# Altium PCB POD-Design-v1.1.PcbDoc (part 5 of 7)
Units mil, origin at the board's own origin, x right, y up, seen from the top; angles counter-clockwise.
Board outline 5511.81 x 3937.01 mil, 4 copper layers (Top Layer, Layer 1, Layer 2, Bottom Layer), stack 61.653 mil thick; 308 components, 227 nets, 905 pads, 367 vias.
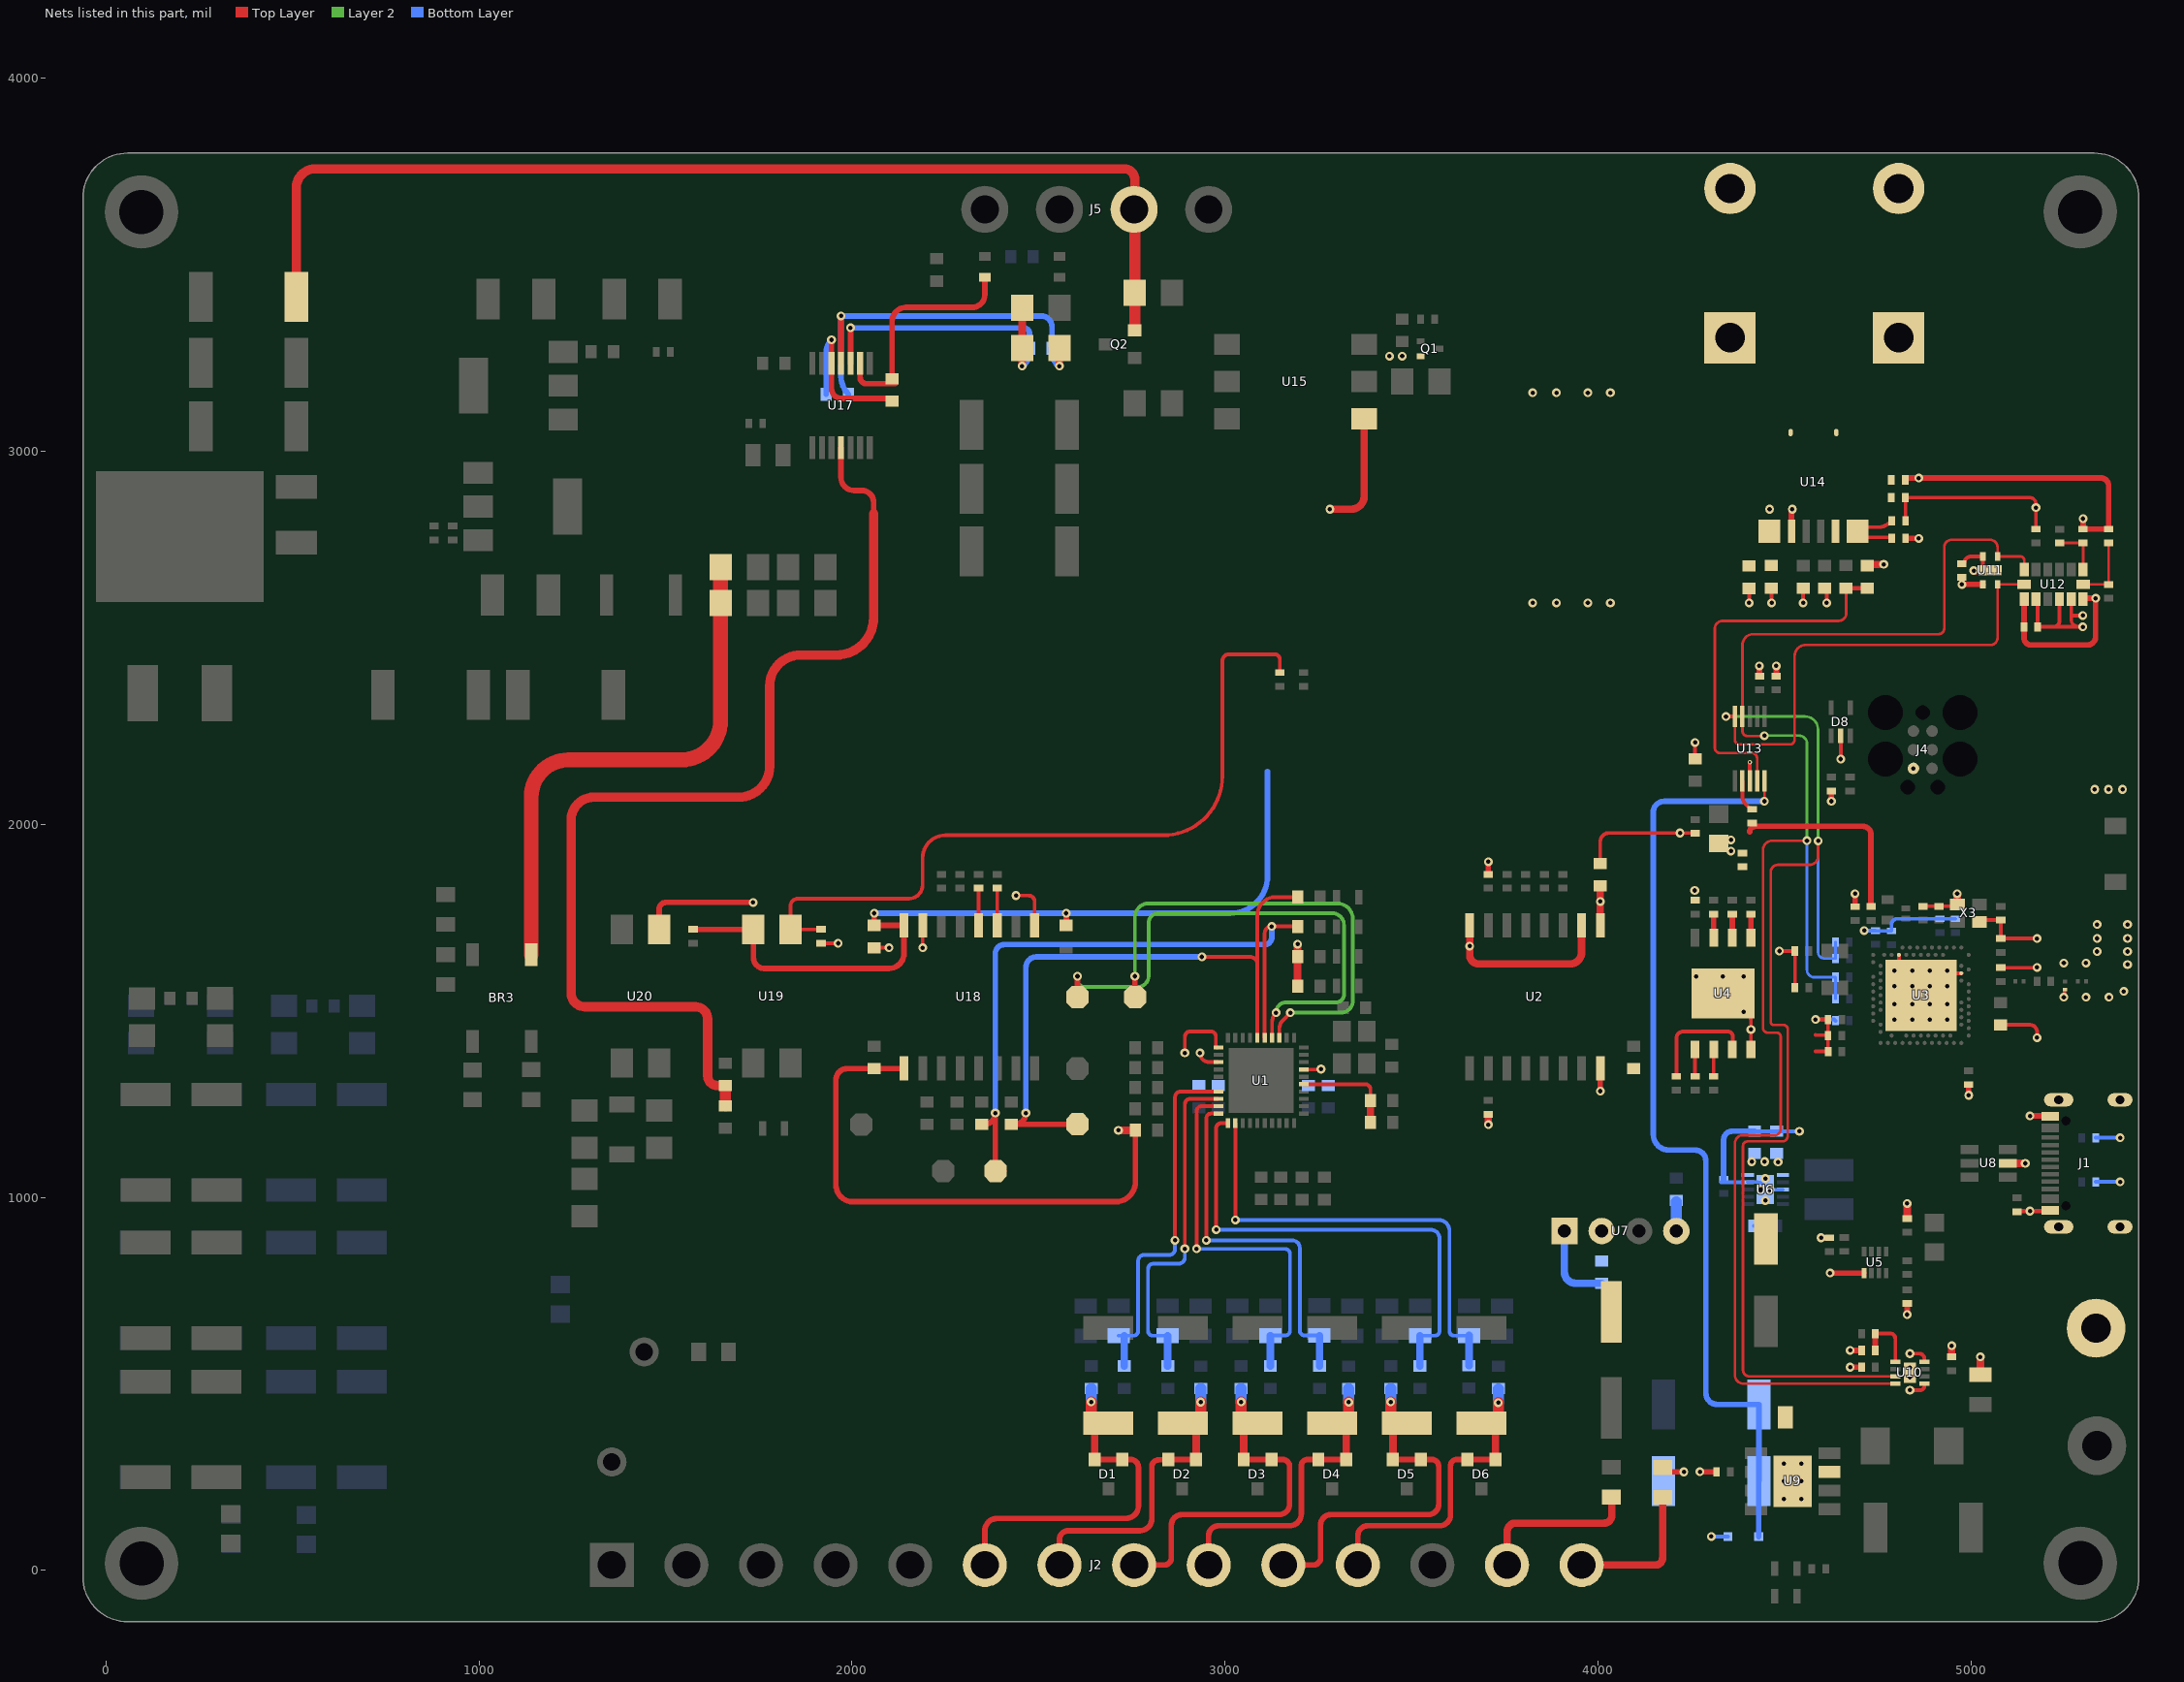
[diagram p4: the nets of this part, all layers, seen from the top]

## Part data (continued)
U17: "IC SIGNAL PROCESSOR 14TSSOP", LCSC Part Number=C904570, Manufacturer=onsemi, Manufacturer Lifecycle Status=ACTIVE, Max Operating Temperature=70°C, Max Supply Current=10mA, Max Supply Voltage=13V, Min Operating Temperature=0°C, Operating Supply Voltage=12V, China RoHS=Compliant, ComponentLink1Description=https://datasheet.octopart.com:443/NCS37020DTBR2G-onsemi-datasheet-180965843.pdf?src-supplier=IHS, ComponentLink1URL=https://datasheet.octopart.com:443/NCS37020DTBR2G-onsemi-datasheet-180965843.pdf?src-supplier=IHS, ComponentLink2Description=https://datasheet.octopart.com:443/NCS37020DTBR2G-ON-Semiconductor-datasheet-139012421.pdf?src-supplier=Master+Electronics, ComponentLink2URL=https://datasheet.octopart.com:443/NCS37020DTBR2G-ON-Semiconductor-datasheet-139012421.pdf?src-supplier=Master+Electronics, ComponentLink3Description=https://datasheet.octopart.com:443/NCS37020DTBR2G-ON-Semiconductor-datasheet-137129895.pdf?src-supplier=onsemi, ComponentLink3URL=https://datasheet.octopart.com:443/NCS37020DTBR2G-ON-Semiconductor-datasheet-137129895.pdf?src-supplier=onsemi, ComponentLink4Description=http://sigma.octopart.com:80/reach_statement/ON-Semiconductor-company-79.pdf?src-supplier=Compliance+Statements, ComponentLink4URL=http://sigma.octopart.com:80/reach_statement/ON-Semiconductor-company-79.pdf?src-supplier=Compliance+Statements, ComponentLink5Description=https://octopart.com:443/opatz8j6/c1?t=ZQW9HMtH4k71rWyV6AJY4tuW3XheiTOPmjmobTXB_F26sMcwWMhmH10pq7sQJYBRXfGSHYWRpmqpvFarTcJ6IR5mJHNE_a9wC_wytZDRLioJeZ7QsJAeRfWIGI1BjBRFqUYimvJtzLjCjz17RDpSBx7XSL-tIesgpAoA9dkWd1QvjggH5Lf3PglFk8Jmj008jqbUnKitEB1RpbYA_80My9UupV7zL5uwbriqM9u8ka-eDVP0HHlgEyvlk90TkPkxt1apKx9jOG4F6f6WcXkBfOtrxuHJ_x8hryS4-VTjD0u0BN_yaFUAv4LE__5U5qDUiotF1QbODTNZ71WeSvwhQDdPzE4qpMHglnhuqzT235XeMYg&src-supplier=Compliance+Statements, ComponentLink5URL=https://octopart.com:443/opatz8j6/c1?t=ZQW9HMtH4k71rWyV6AJY4tuW3XheiTOPmjmobTXB_F26sMcwWMhmH10pq7sQJYBRXfGSHYWRpmqpvFarTcJ6IR5mJHNE_a9wC_wytZDRLioJeZ7QsJAeRfWIGI1BjBRFqUYimvJtzLjCjz17RDpSBx7XSL-tIesgpAoA9dkWd1QvjggH5Lf3PglFk8Jmj008jqbUnKitEB1RpbYA_80My9UupV7zL5uwbriqM9u8ka-eDVP0HHlgEyvlk90TkPkxt1apKx9jOG4F6f6WcXkBfOtrxuHJ_x8hryS4-VTjD0u0BN_yaFUAv4LE__5U5qDUiotF1QbODTNZ71WeSvwhQDdPzE4qpMHglnhuqzT235XeMYg&src-supplier=Compliance+Statements, ComponentLink6Description=https://octopart.com:443/opatz8j6/c1?t=HismN954h6fGmh9fmuQcgXhTaW1LIpJi1zfdE4ekLkTpZNiJX5OuPT8uhS35awRxYVrPSlueGbHyRXMTAgi5oFyNekVsRZ8Wf8rZ0DBuUfKFuVTFVFD9ObD5jmIONxQZYnS7ApbkheX8jjM_HLR7wXao3cq_nbkOSh1zihM_Cb25b-mOFKzO57l-cPraBIcXhIIoS2L5CzwghySSn828_I70UIOuSkvLkmcdjxM7wbVRBzaqQtktMNEHz6OXR8jKrzYQQpbeYqdyN6vjnc-d046VHgn1wFMO-_Mp3x6HmAFm7wxh74XFnntKtcXzz-IGW-eRo0i-X4dDM8t3zvT-QSalQbhBf0_OjmbV5ssDUWXnLg&src-supplier=Compliance+Statements, ComponentLink6URL=https://octopart.com:443/opatz8j6/c1?t=HismN954h6fGmh9fmuQcgXhTaW1LIpJi1zfdE4ekLkTpZNiJX5OuPT8uhS35awRxYVrPSlueGbHyRXMTAgi5oFyNekVsRZ8Wf8rZ0DBuUfKFuVTFVFD9ObD5jmIONxQZYnS7ApbkheX8jjM_HLR7wXao3cq_nbkOSh1zihM_Cb25b-mOFKzO57l-cPraBIcXhIIoS2L5CzwghySSn828_I70UIOuSkvLkmcdjxM7wbVRBzaqQtktMNEHz6OXR8jKrzYQQpbeYqdyN6vjnc-d046VHgn1wFMO-_Mp3x6HmAFm7wxh74XFnntKtcXzz-IGW-eRo0i-X4dDM8t3zvT-QSalQbhBf0_OjmbV5ssDUWXnLg&src-supplier=Compliance+Statements, Height - Seated (Max)=1.2mm, Item Type="Sensor and Detector Interfaces", Length=5mm, Lifecycle Status=Production, Manufacturer Part Number=NCS37020DTBR2G, Number of Terminals=14, Pricing="1=0.99, 10=0.713, 25=0.6436, 100=0.5668, 250=0.53028, 500=0.50824, 1000=0.4901 (USD)", REACH SVHC=Yes, RoHS=Compliant, Stock=2623, Supplier=DigiKey, Terminal Pitch=650µm, Width=4.4mm
U18: "DGTL ISO 5000VRMS 4CH GP 16SOIC", LCSC Part Number=C529547, Manufacturer="Texas Instruments", ComponentLink1Description=http://www.ti.com/general/docs/lit/getliterature.tsp?genericPartNumber=ISO7740&fileType=pdf&src-supplier=Farnell, ComponentLink1URL=http://www.ti.com/general/docs/lit/getliterature.tsp?genericPartNumber=ISO7740&fileType=pdf&src-supplier=Farnell, ComponentLink2Description=http://www.ti.com/lit/ds/symlink/iso7741.pdf?src-supplier=Digikey, ComponentLink2URL=http://www.ti.com/lit/ds/symlink/iso7741.pdf?src-supplier=Digikey, ComponentLink3Description=http://www.farnell.com/datasheets/2113498.pdf?src-supplier=Element14, ComponentLink3URL=http://www.farnell.com/datasheets/2113498.pdf?src-supplier=Element14, ComponentLink4Description=http://www.ti.com/general/docs/suppproductinfo.tsp?distId=10&amp;gotoUrl=http%3A%2F%2Fwww.ti.com%2Flit%2Fgpn%2Fiso7741&src-supplier=Digikey, ComponentLink4URL=http://www.ti.com/general/docs/suppproductinfo.tsp?distId=10&amp;gotoUrl=http%3A%2F%2Fwww.ti.com%2Flit%2Fgpn%2Fiso7741&src-supplier=Digikey, Height=2.65mm, Item Type=IC, Lead Free=5697LeadFree, Length=10.3mm, Manufacturer Part Number=ISO7740DWR, Pricing="1=2.71, 10=1.85, 50=1.85, 100=1.61, 1000=1.59, 10000=1.59 (USD)", RoHS=Yes, Stock=19329, Supplier=Mouser, Thickness=2.35mm, Width=7.5mm
U19 U20: "OPTOISOLATOR 5.3KV TRANS 4SMD", LCSC Part Number=C5156027, Manufacturer=Vishay, Item Type=IC, Manufacturer Part Number=SFH6156-2, Pricing="1=0.56, 10=0.37, 50=0.37, 100=0.253, 1000=0.218, 10000=0.217 (USD)", RoHS=No, Stock=11480, Supplier=Mouser
X1: library part X322524576MOB4SI, "24.576MHz Surface Mount Crystal 12pF ±10ppm ±20ppm SMD3225-4P Crystals ROHS", LCSC Part Number=C70568, Manufacturer=YXC, ComponentLink1Description=LCSC, ComponentLink1URL=https://www.lcsc.com/product-detail/Crystals_YXC-Crystal-Oscillators-X322524576MOB4SI_C70568.html?s_z=n_X322524576MOB4SI, Item Type=Crystal, Manufacturer Part Number=X322524576MOB4SI, RoHS=No, Supplier=LCSC
X2: library part Q13FC13500049, "Crystal, 32.768KHZ, 6PF, 3.2MM X 1.5MM Rohs Compliant: Yes", LCSC Part Number=C95361, Manufacturer=Epson, Item Type=Crystal, Manufacturer Part Number=Q13FC13500049, Pricing="100=5.52, 250=5.41 (DKK)", RoHS=No, Stock=760, Supplier=Farnell
X3: library part Q22FA12800025, "CRYSTAL 32.0000MHZ 8PF SMD", LCSC Part Number=C187794, Manufacturer=Epson, ComponentLink1Description=http://ndap3-net.ebz.epson.co.jp/w/www/PDFS/epdoc_qd.nsf/85a4e2c523a1f89349257068002f9e30/255cb2884010a1f9492571f0004c7d72/$FILE/FA-128_E09X.pdf?src-supplier=Newark, ComponentLink1URL=http://ndap3-net.ebz.epson.co.jp/w/www/PDFS/epdoc_qd.nsf/85a4e2c523a1f89349257068002f9e30/255cb2884010a1f9492571f0004c7d72/$FILE/FA-128_E09X.pdf?src-supplier=Newark, ComponentLink2Description=http://www.farnell.com/datasheets/1734615.pdf?src-supplier=Newark, ComponentLink2URL=http://www.farnell.com/datasheets/1734615.pdf?src-supplier=Newark, Item Type=Crystal, Manufacturer Part Number=Q22FA12800025, Pricing="250=0.511 (GBP)", RoHS=Yes, Stock=250, Supplier=Farnell

## Free pads (board coordinates)
  round 196.85 hole 118.11: MH(95.31,3641.74) MH(95.67,19.32) MH(5292.52,3642.09) MH(5292.88,19.68)

## Via types
v1: diameter 23.62, hole 11.81, Top Layer to Bottom Layer, tented both sides, 332 vias
v2: diameter 11.81, hole 5.91, Top Layer to Bottom Layer, tented both sides, 34 vias
v3: diameter 15.75, hole 5.91, Top Layer to Bottom Layer, tented both sides, 1 vias

## Nets (pads, with @x,y where several pads share a name; then routed paths per layer and width w, separated by ;. In a path a pad name is that pad's centre, name@x,y a point inside that pad or via, vN(x,y) a via of type N, cw(c..) or ccw(c..) an arc to the next point about the centre after c; other vN are vias at no path point)
3V3: C15.2 C57.2 C58.2 C61.2 C67.2 C68.1 C71.2 C73.2 C74.2 C110.2 FB6.2 R21.1 R54.1 R67.2 R76.1 R78.2 R79.2 R82.2 R89.1 R90.1 R157.1 R161.1 U2.1 U6.1 U6.10 U7.2 U11.1 U12.1 U12.6 U14.1 U15.1 U18.16 U19.4 | length 4682.3
  Top Layer w15: R157.1@1574,1718.54 U19.4@1735,1718.54 cw(c1735,1717.54) 1736,1717.54 1736,1642.53 ; 1736,1641 1736,1642.53 ; v1(2059.49,1761.85) C110.2@2059.49,1729.37 U18.16@2139.49,1729.37 2139.49,1654.37 cw(c2099.11,1654.37) 2099.11,1614 1764.53,1614 cw(c1764.53,1642.53) 1736,1642.53 ; R161.1@2574.49,1729.37 v1(2574.49,1761.85) ; R21.1@3705.93,1865.94 v1(3705.93,1900) ; 4406.71,1980 cw(c4421.64,1980) 4421.64,1994.93 4709.9,1994.93 cw(c4709.9,1973.17) 4731.66,1973.17 R54.1@4731.66,1779.82 ; v1(4597.95,891.9) R67.2@4620.63,891.91 ; v1(4676,590) R76.1@4706.38,590 ; R90.1@4823.42,2928.65 v1(4859.92,2928.65) ; R89.1@4824.42,2766.69 v1(4859.96,2766.69) ; v1@4860.6,2928.65 5347.79,2928.65 cw(c5347.79,2907.63) 5368.81,2907.63 R79.2@5368.81,2791.64 R78.2@5300.39,2791.64 v1@5300.39,2819.56 ; C67.2@4975.32,2662.25 v1(4975.32,2643.35) U11.1@5031.63,2643.35 ; U12.1@5141.74,2602.8 C68.1@5141.74,2529.64 5141.74,2500.26 ccw(c5161,2500.26) 5161,2481 5311.7,2481 ccw(c5311.7,2503.33) 5334.03,2503.33 v1(5334.03,2606.35) ; U12.6@5300,2603.58 5302.76,2606.35 v1@5333.82,2606.35
  Top Layer w20: v1(3280.96,2845) 3339,2845 ccw(c3339,2879.02) 3373.02,2879.02 U15.1@3373.02,3087.25 ; U2.1@4005.93,1729.37 v1(4005.93,1793.48) C15.2@4005.93,1835.44
  Bottom Layer w15: v1(2059.49,1761.85) v1(2574.49,1761.85) 3014,1761.85 ccw(c3014,1861.85) 3114,1861.85 3114,2142
  other v1: 4482.77,1094.86 4412.27,1096.06 4446.77,1096.06 4356.06,1928.61 4356.06,1958.61 5300.35,2819.56 4459.96,2845
3V3-IS: C16.2 C24.2 C25.2 C62.2 C111.2 R22.2 R23.1 R28.2 R29.2 U1.1 U1.27 U2.16 U7.4 U18.1 | length 2025
  Top Layer w10: v1(2892.36,1387.48) 2892.36,1431.04 cw(c2906.01,1431.04) 2906.01,1444.69 2962.29,1444.69 cw(c2962.29,1431.4) 2975.59,1431.4 2975.59,1402.6 2976.1,1402.08 U1.1@2982.03,1402.08 ; U1.27@3210.97,1343.03 v1@3257.25,1343.03 ; v1@4005,1285 ccw(c4005,1285.93) v1@4005.93,1285.93
  Top Layer w15: U18.1@2139.49,1345.51 C111.2@2059.49,1345.51 1987.51,1345.51 ccw(c1987.51,1315) 1957,1315 1957,1033.97 ccw(c2002.5,1033.97) 2002.5,988.47 2706.3,988.47 ccw(c2706.3,1042.17) 2760,1042.17 R23.1@2760,1180 ; v1@4005.93,1285.93 U2.16@4005.93,1345.51
  Top Layer w20: v1(2714.35,1180) R23.1@2760,1180 ; R28.2@3194.56,1566.75 R29.2@3194.56,1646.16 v1(3194.56,1679.19) ; v1(3705.93,1195) R22.2@3705.93,1220.5
  Bottom Layer w30: U7.4@4210,910 C62.2@4210,988.05
  other v1: 4005.93,1285 3257.25,1344.2
ACCEL_CS: R64.2 R79.1 U12.7 | length 179.7
  Top Layer w7: U12.7@5300.39,2643.35 R64.2@5368.81,2643.35 R79.1@5368.81,2754.64
ACCEL_INT: R63.2 R78.1 U12.8 | length 134.8
  Top Layer w7: R63.2@5237.75,2754.44 5237.75,2754.64 R78.1@5300.39,2754.64 5300.39,2683.11 U12.8@5300,2683.11
ALARM-1: R92.2 R175.2 U19.3 | length 2048.6
  Top Layer w10: R175.2@1917,1718.54 U19.3@1835,1718.54 1835,1781 cw(c1855,1781) 1855,1801 2152.55,1801 ccw(c2152.55,1837.94) 2189.49,1837.94 2189.49,1910.04 cw(c2250.45,1910.04) 2250.45,1971 2834.33,1971 ccw(c2834.33,2129.67) 2993,2129.67 2993,2438.81 cw(c3010.34,2438.81) 3010.34,2456.15 3133.03,2456.15 cw(c3133.03,2442.17) 3147,2442.17 R92.2@3147,2407
ALRT_RDY: R82.1 U13.2 | length 87.1
  Top Layer w10: U13.2@4387.02,2116.14 4387.02,2076.84 ccw(c4421.17,2076.84) 4397,2052.72 4405.03,2044.69 4409.02,2044.69 R82.1@4413.02,2040.69
AVDD1: C20.2 C21.2 U1.25 | length 276
  Top Layer w10: U1.25@3210.97,1303.66 3375.82,1303.66 cw(c3375.82,1289.49) 3390,1289.49 C20.2@3390,1260
  Top Layer w20: C21.2@3389.99,1200.65 C20.2@3390,1260
BAT_ALERT: R62.2 R76.2 U10.5 | length 168.8
  Top Layer w10: R62.2@4743.38,635 4743.38,635.46 4783.23,635.46 cw(c4783.23,621.65) 4797.05,621.65 U10.5@4797.05,559.83
  Top Layer w15: R76.2@4743.38,590 R62.2@4743.38,635
CF1_1: TP5.1 U1.33 | length 1326.3
  Top Layer w10: TP5.1@2758.49,1537.44 TP5.1@2759.01,1537.44 ; U1.33@3145.71,1427.97 3145.71,1452.72 cw(c3177.49,1452.72) 3155.01,1475.19 v1(3175.24,1495.41)
  Top Layer w15: TP5.1@2758.49,1537.44 v1(2758.49,1593)
  Layer 2 w10: v1(2758.49,1593) 2758.49,1751.54 cw(c2795.07,1751.54) 2795.07,1788.12 3300.6,1788.12 cw(c3300.6,1745.99) 3342.73,1745.99 3342.73,1527.59 cw(c3310.55,1527.59) 3310.55,1495.41 v1(3175.24,1495.41)
CF2_1: TP6.1 U1.34 | length 1449.1
  Top Layer w10: U1.34@3126.03,1427.97 3126.03,1469.71 3126.03,1469.77 cw(c3162.28,1469.77) v1(3136.64,1495.41)
  Top Layer w15: TP6.1@2604.49,1537.44 v1(2604.49,1593)
  Layer 2 w10: v1(2604.49,1593) 2604.49,1582.44 ccw(c2622.51,1582.44) 2622.51,1564.42 2766.51,1564.42 ccw(c2766.51,1592.98) 2795.07,1592.98 2795.07,1735.36 cw(c2821.56,1735.36) 2821.56,1761.85 3287.15,1761.85 cw(c3287.15,1730) 3319,1730 3319,1544.51 cw(c3297.5,1544.51) 3297.5,1523 3164.24,1523 ccw(c3164.24,1495.41) v1(3136.64,1495.41)
CF3: R168.2 U18.12 | length 99.6
  Top Layer w10: U18.12@2339.49,1729.37 R168.2@2339.49,1828.94
CF3_1: R26.2 R164.1 TP7.1 U1.35 | length 1824.2
  Top Layer w10: U1.35@3106.34,1427.97 3106.34,1707.67 cw(c3125.41,1707.67) v1@3125.41,1726.75 ; v1(3125.41,1726.69) v1@3125.41,1726.75 ; R26.2@3194.56,1725.58 3193.39,1726.75 v1@3125.41,1726.75
  Top Layer w15: R164.1@2347.22,1196.18 2354.17,1196.18 ccw(c2354.17,1226.18) v1(2384.17,1226.18) 2384.17,1093.68 ccw(c2406.67,1093.68) TP7.1@2406.67,1071.18
  Bottom Layer w15: v1(2384.17,1226.18) 2384.17,1653.12 cw(c2409.05,1653.12) 2409.05,1678 3106.41,1678 ccw(c3106.41,1697) 3125.41,1697 v1(3125.41,1726.69)
CF4: R169.2 U18.11 | length 99.6
  Top Layer w10: U18.11@2389.49,1729.37 R169.2@2389.49,1828.94
CF4_1: R27.2 R165.1 TP8.1 U1.36 | length 1726.8
  Top Layer w10: v1(2937.91,1644.92) 3066.44,1644.92 cw(c3066.44,1624.71) 3086.66,1624.71 ; U1.36@3086.66,1427.97 3086.66,1624.71 ; R27.2@3194.56,1804.99 3155.19,1804.99 3134.69,1805 ccw(c3134.69,1756.97) 3086.66,1756.97 3086.66,1624.71
  Top Layer w15: R165.1@2427.67,1196.18 R165.1@2436,1196.18 ; v1(2466,1226.18) cw(c2436,1226.18) R165.1@2436,1196.18 ; TP8.1@2604.49,1196.18 R165.1@2436,1196.18
  Bottom Layer w15: v1(2466,1226.18) 2466,1616.1 cw(c2494.82,1616.1) 2494.82,1644.92 v1(2937.91,1644.92)
CTB: C102.2 FB7.1 U17.2 | length 651.8
  Top Layer w15: U17.2@2021.84,3235.85 2021.84,3198.41 ccw(c2038.74,3198.41) 2038.74,3181.51 2116.06,3181.51 C102.2@2116.06,3181.76 ; C102.2@2094.57,3181.51 ccw(c2094.57,3194.61) 2100.33,3182.85 2103.39,3185.91 2104.59,3187.11 C102.2@2107.66,3194.61 2107.66,3348.66 cw(c2145,3348.66) 2145,3386 2322.18,3386 ccw(c2322.18,3419.93) 2356.1,3419.93 FB7.1@2356.1,3466.89
CTO: C98.1 R136.1 R150.2 U17.4 | length 1083.1
  Top Layer w15: U17.4@1970.66,3235.85 v1(1970.66,3363)
  Top Layer w20: v1(2556.1,3228.66) R136.1@2556.1,3276.42
  Bottom Layer w15: R150.2@1990.66,3152.86 cw(c2038.95,3201.14) 1970.66,3201.14 v1(1970.66,3363) 2507.1,3363 cw(c2507.1,3334) 2536.1,3334 C98.1@2536.1,3276.42
  Bottom Layer w20: C98.1@2536.1,3276.42 ccw(c2603.13,3276.42) 2555.74,3229.03 v1(2556.1,3228.66)
CTS: C98.2 R136.2 R137.1 U17.3 | length 832.5
  Top Layer w15: U17.3@1996.25,3235.85 v1(1996.25,3331.14)
  Top Layer w20: v1(2456.1,3228.66) R136.2@2456.1,3276.42 R137.1@2456.1,3384.93
  Bottom Layer w15: v1(1996.25,3331.14) 2460.39,3331.14 cw(c2460.39,3315.42) 2476.1,3315.42 C98.2@2476.1,3276.42
  Bottom Layer w20: v1(2456.1,3228.66) 2456.47,3229.03 ccw(c2409.07,3276.42) C98.2@2476.1,3276.42
DC_CUR: C76.2 R88.1 U13.4 | length 1009.1
  Top Layer w7: U13.4@4426.39,2116.14 4426.39,2177.36 ccw(c4412.61,2177.36) 4412.61,2191.14 4327.86,2191.14 cw(c4327.86,2206) 4313,2206 4313,2523.82 cw(c4334.75,2523.82) 4334.75,2545.56 4644.91,2545.56 ccw(c4644.91,2566.01) 4665.36,2566.01 R88.1@4665.36,2633.57
  Top Layer w12: R88.1@4665.36,2633.57 4668.17,2633.57 C76.2@4721.68,2633.57
DC_CUR_NEG: J8.1 U14.7
DC_CUR_POS: J7.1 U14.8
DC_OCD1: C78.2 R89.2 U14.6 | length 200.3
  Top Layer w10: 4753.09,2796.86 4720.23,2796.86 U14.6@4695.7,2785.6 ccw(c4711.6,2785.6) 4711.6,2769.69 R89.2@4786.42,2769.69 ; 4753.13,2796.86 ccw(c4753.13,2834.16) 4776.05,2804.73 4782.42,2809.68 C78.2@4786.08,2816.67
DC_OCD2: C79.2 R90.2 U14.5
DC_VOLTS: D7.2 R85.1 R86.2 U13.5 | length 2549.6
  Top Layer w7: v1@4445,2062 ccw(c4445,2063.08) 4446.08,2063.08 U13.5@4446.08,2116.14
  Bottom Layer w15: D7.2@4430.63,91.22 R86.2@4430.63,239.22 ; R86.2@4431.27,240.07 R85.1@4431.27,445.13 4319.75,445.13 cw(c4319.75,475.88) 4289,475.88 4289,1098.21 ccw(c4260,1098.21) 4260,1127.21 4189.79,1127.21 cw(c4189.79,1169) 4148,1169 4148,2032 cw(c4178,2032) 4178,2062 v1(4446.08,2062)
DC_VOLTS_NEG: J2.14 R87.1 | length 390.3
  Top Layer w20: J2.14@3956.1,14.82 4154.05,14.82 ccw(c4154.05,34) 4173.23,34 R87.1@4173.23,196.22
DC_VOLTS_POS: J2.13 R84.1 | length 445
  Top Layer w20: J2.13@3756.1,14.82 3756.1,103.73 cw(c3779.37,103.73) 3779.37,127 4016.37,127 ccw(c4016.37,147.63) 4037,147.63 4037,195.28 ccw(c4035.43,195.28) R84.1@4035.43,196.85
DVDD1: C18.2 C19.2 U1.3 | length 66.9
  Top Layer w10: v1@2932.94,1383.79 v1(2932.94,1387.48) ccw(c2957.7,1387.48) 2957.7,1362.71 U1.3@2982.03,1362.71
FLASH_CLK: R49.2 U4.6 | length 63.5
  Top Layer w15: U4.6@4359.99,1696.16 R49.2@4359.99,1759.64
FLASH_CS: R48.2 U4.1 | length 72.3
  Top Layer w10: R48.2@4260,1324.64 U4.1@4259.99,1396.95
FLASH_QSPI0: R50.2 U4.5 | length 63.5
  Top Layer w15: U4.5@4409.99,1696.16 R50.2@4409.99,1759.64
FLASH_QSPI1: R51.2 U4.2 | length 72.3
  Top Layer w10: R51.2@4309.99,1324.64 U4.2@4309.99,1396.96
FLASH_QSPI2: R52.2 U4.3 | length 306.4
  Top Layer w10: R52.2@4210.01,1324.64 4210.01,1426.17 cw(c4228.54,1426.17) 4228.54,1444.7 4347.9,1444.7 cw(c4347.9,1431.11) 4361.49,1431.11 4361.49,1398.46 cw(c4359.99,1398.46) U4.3@4359.99,1396.96
FLASH_QSPI3: R53.2 U4.7 | length 63.5
  Top Layer w15: U4.7@4309.99,1696.16 R53.2@4309.99,1759.64
GF_LED: R173.1 R174.1 U17.11 | length 2866.7
  Top Layer w15: U17.11@1970.66,3009.86 1970.66,2930 ccw(c2005.66,2930) 2005.66,2895 2026.34,2895 cw(c2026.34,2863.34) 2058,2863.34 2058,2833
  Top Layer w25: R174.1@1660.99,1300.28 1638.72,1300.28 cw(c1638.72,1326) 1613,1326 1613,1479 ccw(c1581,1479) 1581,1511 1284.25,1511 cw(c1284.25,1548.25) 1247,1548.25 1247,2012 cw(c1308,2012) 1308,2073 1696.1,2073 ccw(c1696.1,2156.18) 1779.28,2156.18 1779.28,2370.91 cw(c1862.37,2370.91) 1862.37,2454 1958,2454 ccw(c1958,2554) 2058,2554 2058,2833
  Top Layer w30: R173.1@1660.99,1245.66 R174.1@1660.99,1300.28
GF_PWR: BR3.1 R170.2 R172.2 | length 1458.8
  Top Layer w40: BR3.1@1140,1650.81 1140,2073 cw(c1240,2073) 1240,2173 1542.31,2173 ccw(c1542.31,2278.41) 1647.73,2278.41 R172.2@1647.73,2594 R170.2@1647.73,2690
GF_SLF_T: J5.2 Q2.2 R99.2 R144.1 | length 2990.1
  Top Layer w25: R144.1@510.38,3414 510.38,3706.64 cw(c561.29,3706.64) 561.29,3757.54 2729.8,3757.54 cw(c2729.8,3729.35) 2758,3729.35 J5.2@2758,3646.89
  Top Layer w30: Q2.2@2758,3324.65 R99.2@2758,3425 J5.2@2758,3646.89
GND: C15.1 C35.1 C36.1 C37.2 C38.1 C39.1 C40.1 C41.1 C42.2 C43.1 C44.2 C46.1 C47.1 C48.1 C49.1 C50.1 C51.1 C52.1 C53.1 C54.1 C55.1 C56.2 C57.1 C58.1 C59.1 C60.1 C61.1 C63.2 C64.2 C65.1 C66.1 C67.1 C68.2 C69.1 C70.1 C71.1 C72.2 C73.1 C74.1 C75.1 C76.1 C77.1 C78.1 C79.1 C110.1 D7.1 D8.2 J1.A1/B12 J1.B1/A12 J1.S1 J1.S2 J1.S3 J1.S4 J4.5 L5.1 Q1.2 R69.1 R70.1 R71.2 R72.2 R75.1 R77.1 R80.1 R81.1 R83.1 R86.1 R87.2 R175.1 TP2.1 U2.2 U2.8 U3.74 U3.B7 U3.F23 U4.4 U4.9 U5.1 U6.3 U6.9 U6.11 U7.1 U8.2 U9.7 U9.9 U10.1 U10.4 U10.9 U11.4 U11.5 U12.2 U12.4 U12.5 U13.3 U14.2 U18.9 U18.15 U20.3 X3.2 X3.4 | length 6097.9
  Top Layer w6: U3.F23@4973.76,1601.08 U3.F23@4973.88,1601.2
  Top Layer w9: v1@4518.54,2845 v1@4518.63,2845 ; C78.1@4824.42,2814.18 4824.42,2875.16 ccw(c4823.42,2875.16) C79.1@4823.42,2876.16 5156.72,2876.16 cw(c5156.72,2858.87) 5174.02,2858.87 v1(5173.97,2848.94) ; J1.A1/B12@5209.99,963.02 J1.A1/B12@5212.5,965.52 ; J1.B1/A12@5210.5,1215.5 ccw(c5210.5,1217.49) J1.B1/A12@5212.5,1217.49 ; U12.5@5268.5,2603.58 5268.5,2549.13 ccw(c5287.09,2549.13) 5287.09,2530.54 5299.49,2530.54 v1@5300.39,2529.64
  Top Layer w10: R175.1@1917,1681.54 1963,1681.54 v1(1963,1681.37) ; C110.1@2059.49,1669.37 v1(2099.11,1669.37) ; v1(2189.49,1669.37) U18.15@2189.49,1729.37 ; v1(2439.49,1809.22) 2473.48,1809.22 cw(c2473.48,1793.21) 2489.49,1793.21 U18.9@2489.49,1729.37 ; C15.1@4005.93,1895.44 4005.93,1953.83 cw(c4029.1,1953.83) 4029.1,1977 v1(4220,1977) 4259.19,1977 C69.1@4260,1976.19 ; R87.2@4173.23,276.22 R87.2@4185.04,264.41 ; C70.1@4260.01,2176.14 v1(4260.01,2219.45) ; v1@4273,264.41 v1(4273,264.92) ; U4.9@4335,1546.57 cw(c4335,1471.58) 4409.99,1471.58 v1(4409.99,1450.15) U4.4@4409.99,1396.95 ; v1(4405,2594) C73.1@4405.01,2632.52 ; U13.3@4406.71,2116.14 v2@4406.71,2166.73 ; R83.1@4432.3,2397.69 R83.1@4433.01,2397.69 ; C74.1@4465.01,2633.62 4465.33,2633.62 v1(4465.33,2594) ; v1@4477.83,2425 v1(4478,2425) ; v1(4486.03,1660.57) C40.1@4528,1660.57 C41.1@4528,1562.14 ; v1(4549.67,2594) C75.1@4549.67,2633.59 ; 4582.57,1436.25 4583.67,1435.15 4615.23,1435.15 C51.1@4616.5,1433.87 ; v1(4583,1477.07) C50.1@4616.5,1477.07 C54.1@4616.5,1391.38 ; 4583.27,1391.38 C54.1@4616.5,1391.38 ; C77.1@4607.98,2633.58 cw(c4607.98,2628.52) 4613.04,2628.52 v1(4613.04,2594) ; C54.1@4616.77,1391.38 C54.1@4616.5,1391.38 ; v1(4650.61,2175.13) D8.2@4650.61,2237.73 ; C76.1@4721.68,2693.57 cw(c4725.11,2693.57) C76.1@4725.11,2697 ; U3.74@4806.56,1629.96 U3.B7@4806.56,1650.41 ; v1(4836.02,483.53) 4863.56,483.53 ccw(c4863.56,494.98) 4875,494.98 U10.1@4875,500.78 ; v1(4836.02,581.5) 4861.22,581.5 cw(c4861.22,567.72) 4875,567.72 U10.4@4875,559.83 ; C35.1@4871.63,1780.63 C47.1@4914,1780.63 X3.2@4963.47,1780.63 ; U3.74@4953.31,1601.08 U3.F23@4973.76,1601.08 ; X3.2@4962.72,1786.49 X3.2@4963.47,1785.74 ; v1(4962.72,1814.39) v1@4962.72,1816.44 ; C67.1@4975.32,2699.25 C67.1@4975.32,2700.05 ; C67.1@4981.78,2700.05 cw(c4999.88,2700.05) 4999.88,2718.15 U11.4@5031.63,2718.15 U11.5@5031.63,2681.37 ; C55.1@4993,1302.5 C55.1@4993.27,1302.23 ; v1@4993.27,1274.34 v1(4993.53,1274.07) ; X3.4@5027.16,1743.63 C46.1@5079.63,1743.63 C42.2@5079.62,1694.01 v1(5176.99,1694.01) ; U11.5@5051.32,2680.25 U11.5@5051.32,2680.75 ; C49.1@5079.61,1462.76 5157.53,1462.76 cw(c5157.53,1443.3) 5176.99,1443.3 v1(5176.99,1428.46) ; C48.1@5079.61,1615.87 5176.99,1615.87 v1(5176.99,1616.45) ; U12.2@5174.02,2603.58 cw(c5174.02,2598.86) 5178.74,2598.86 C68.2@5178.74,2529.64 5221.26,2529.64 ; R80.1@5174.02,2791.64 v1(5173.97,2848.94) ; U12.4@5237.01,2603.58 5237.01,2545.39 cw(c5221.26,2545.39) 5221.26,2529.64 ; v1(5248.61,1536.66) 5250.58,1538.64 5250.58,1557.14 5250.66,1557.22 L5.1@5251.49,1557.22 ; 5270.34,2560 v1(5299.49,2560) ; v1@5300.39,2529.64 v1(5299.49,2529.64) 5221.26,2529.64
  Top Layer w12: C63.2@5122.59,963.02 J1.A1/B12@5209.99,963.02
  Top Layer w15: U20.3@1483,1718.54 1483,1772.61 cw(c1501.39,1772.61) 1501.39,1791 v1(1735,1791) ; R87.2@4185.04,264.41 v1(4230,264.41) ; v1@4273,264.41 R75.1@4317.64,264.41 ; R83.1@4432.3,2397.69 v1(4432.3,2425) ; R81.1@4477.83,2397.69 v1@4477.83,2425 ; U14.2@4518.54,2785.6 v1@4518.54,2845 ; v1(4621.87,797.3) U5.1@4712.28,797.3 ; v1(4625.62,2062) C38.1@4625.62,2089.62 ; v1(4676,545.15) R77.1@4706.38,545.15 ; C43.1@4689,1779.5 v1(4689,1814.39) ; v1(4828.82,686) R69.1@4828.82,715.74 ; v1@4993.27,1274.34 C55.1@4993.27,1302.23 ; v1(5158,1218.5) J1.B1/A12@5210.5,1218.5
  Top Layer w20: U2.8@3655.93,1729.37 v1(3655.93,1673.93) 3655.93,1650.42 ccw(c3680.36,1650.42) 3680.36,1626 3925,1626 ccw(c3925,1656.93) 3955.93,1656.93 U2.2@3955.93,1729.37 ; C76.1@4725.11,2697 v1(4766,2697) ; R70.1@4828.83,948.08 v1(4828.83,984) ; C66.1@4948.05,574.7 v1(4948.05,602.5) ; X3.2@4962.72,1786.49 v1(4962.72,1814.39) ; v1@5010.32,2680.25 U11.5@5051.32,2680.25 ; C65.1@5025,525 v1(5025,572.5) ; U8.2@5098.57,1091.5 v1(5145.44,1091.43)
  Bottom Layer w9: U6.9@4401.25,1040.91 4428.62,1040.91 cw(c4428.62,1021.22) U6.11@4448.3,1021.22 ; v1(4461.08,1021.22) U6.3@4495.35,1021.22
  Bottom Layer w10: v1(4303.53,91.22) D7.1@4347.95,91.22 ; C60.1@4329.86,1040.91 U6.9@4387.25,1040.91 ; C59.1@4418.3,923.83 cw(c4418.3,915.13) 4427,915.13 4427,829 ; C57.1@4419.68,1177.59 C58.1@4478.68,1177.59 v1(4539.83,1177.59) ; v1(4583,1477.07) 4633.52,1477.07 C52.1@4636.72,1473.88 ; v1(4713.43,1715.2) C36.1@4743.6,1715.2 4743.6,1714.5 C44.2@4786.6,1714.5 ; C44.2@4786.87,1714.5 C44.2@4786.6,1714.5 ; C39.1@4957.97,1747.05 C37.2@4916.57,1747.05 4801.83,1747.05 ccw(c4801.83,1731.82) 4786.6,1731.82 C44.2@4786.6,1714.5 ; R71.2@5334,1041.89 v1(5399.5,1041.89) ; R72.2@5334,1160 v1(5399.5,1160)
  Bottom Layer w15: C60.1@4336.68,1048.09 4336.68,1154.27 cw(c4360,1154.27) 4360,1177.59 C57.1@4419.68,1177.59
  Bottom Layer w20: U7.1@3910,910 3910,800 ccw(c3940,800) 3940,770 C61.1@4010,770
  other v1: 4497.76,192 4545,192 4497.76,239.24 4545,239.24 4497.76,286.49 4545,286.49 4836.18,518.42 4836.18,544 5158,963.53 4448.3,991.69 4436.52,1021.22 4448.3,1050.75 4794.75,1476.28 4841.99,1476.28 4889.24,1476.28 4936.48,1476.28 4390,1497 4794.75,1518.52 4841.99,1518.52 4889.24,1518.52 4936.48,1518.52 5308.14,1536.95 5369.74,1536.95 5409.49,1552.59 4794.75,1565.76 4841.99,1565.76 4889.24,1565.76 4936.48,1565.76 4263,1592.6 4335,1592.6 4390,1592.6 4794.75,1608.01 4841.99,1608.01 4889.24,1608.01 4936.48,1608.01 5419.53,1624.28 5248.61,1628.3 5308.14,1628.3 5338,1659.29 5419.53,1659.29 5338,1694.3 5419.53,1694.3 5338,1731.6 5419.53,1731.6 4259.19,1822.99 5331.4,2093.84 5368.7,2093.84 5406,2093.84 4845.61,2150.13 3824.97,2594 3888.33,2594 3972.67,2594 4033.01,2594 5007.32,2680.25 4520.63,2845 3824.97,3157 3888.33,3157 3972.67,3157 4033.01,3157 3441,3255.31 3475.01,3255.31
  other v2: 4406.76,2166.73
I2C_SCL: R56.2 R66.2 U10.7 U11.2 U12.14 U13.10 | length 4325.9
  Top Layer w7: U13.10@4367.34,2289.37 4367,2289.37 4367,2226.55 ccw(c4379.11,2226.55) 4379.11,2214.44 4514.32,2214.44 ccw(c4514.32,2227.12) 4527,2227.12 4527,2451 cw(c4557,2451) 4557,2481 5052,2481 ccw(c5052,2500) 5071,2500 U11.2@5071,2643.35 U12.14@5142.13,2643.35 ; v1(4590,1955.97) 4590,1915 cw(c4566.74,1915) 4566.74,1891.74 4482.85,1891.74 ccw(c4482.85,1871.9) 4463,1871.9 4463,1471.1 ccw(c4471.88,1471.1) 4471.88,1462.22 4497.65,1462.22 cw(c4497.65,1451.43) 4508.43,1451.43 4508.43,1164.51 cw(c4494.1,1164.51) 4494.1,1150.18 4400.47,1150.18 ccw(c4400.47,1138.4) 4388.69,1138.4 4388.69,537.18 ccw(c4405.41,537.18) 4405.41,520.46 U10.7@4797.05,520.46
  Top Layer w10: v1(4343,2289.37) U13.10@4367,2289.37
  Layer 2 w7: v1(4343,2289.37) 4554.65,2289.37 cw(c4554.65,2254.01) 4590,2254.01 v1(4590,1955.97)
  Bottom Layer w7: v1(4590,1955.97) 4590,1657.3 ccw(c4606.56,1657.3) 4606.56,1640.74 R56.2@4636.72,1640.74 R66.2@4636.72,1684.2
I2C_SDA: R55.2 R65.2 U10.8 U11.3 U12.13 U13.9 | length 4379.4
  Top Layer w7: v1(4446.08,2237.73) cw(c4445.35,2237.73) 4445.35,2237 4400.8,2237 cw(c4400.8,2250.78) 4387.02,2250.78 U13.9@4387.02,2289.37 4387.02,2480.52 cw(c4416.51,2480.52) 4416.51,2510 4913,2510 ccw(c4913,2525) 4928,2525 4928,2743 cw(c4948,2743) 4948,2763 5051,2763 cw(c5051,2743) 5071,2743 U11.3@5071,2718.15 5132.62,2718.15 cw(c5132.62,2708.25) 5142.52,2708.25 U12.13@5142.52,2683.11 ; v1(4560,1956.37) 4467.37,1956.37 ccw(c4467.37,1931) 4442,1931 4442,1455.38 ccw(c4456.03,1455.38) 4456.03,1441.35 4479.71,1441.35 cw(c4479.71,1431.39) 4489.67,1431.39 4489.67,1183.4 cw(c4473.19,1183.4) 4473.19,1166.92 4388.98,1166.92 ccw(c4388.98,1145.04) 4367.1,1145.04 4367.1,523.72 ccw(c4390.04,523.72) 4390.04,500.78 U10.8@4797.05,500.78
  Layer 2 w7: v1(4446.08,2237.73) 4539.06,2237.73 cw(c4539.06,2216.79) 4560,2216.79 v1(4560,1956.37)
  Bottom Layer w7: v1(4560,1956.37) 4560,1610 ccw(c4579.63,1610) 4579.63,1590.37 R55.2@4636.72,1590.37 R65.2@4636.72,1532.3
IA_N1: D2.1 D2.2 J2.7 R4.1 R5.1 | length 864.4
  Top Layer w15: J2.7@2556.1,14.82 2556.1,82.74 cw(c2580,82.74) 2580,106.64 2771.52,106.64 ccw(c2771.52,138.77) 2803.65,138.77 2803.65,278.44 cw(c2821.36,278.44) 2819.36,296.04 2839.12,297.16 D2.2@2847.77,297.65 D2.1@2922.57,297.65
  Top Layer w20: R4.1@2885.17,394.67 2901.07,394.67 2922.57,373.18 D2.1@2922.57,297.65
  Top Layer w30: R4.1@2887.58,394.67 2934.58,411.17 v1(2934.58,451.56)
  Bottom Layer w30: v1(2934.58,451.56) R5.1@2934.58,487.76
IA_P1: D1.1 D1.2 J2.6 R1.1 R3.2 | length 1022.9
  Top Layer w15: J2.6@2356.1,14.82 2356.1,106.64 cw(c2389.11,106.64) 2389.11,139.64 2734.22,139.64 ccw(c2734.22,173.47) 2768.04,173.47 2768.04,276.21 ccw(c2746.61,276.21) 2746.61,297.65 D1.1@2724.98,297.65 D1.2@2650.18,297.65
  Top Layer w20: D1.2@2650.18,297.65 2650.18,373.18 2671.67,394.67 R3.2@2687.58,394.67
  Top Layer w30: v1(2641.17,452.07) 2641.17,411.17 R3.2@2687.58,394.67
  Bottom Layer w30: v1(2641.17,452.07) R1.1@2641.17,488.28
IAN1: C4.1 R6.2 U1.8 | length 932.1
  Top Layer w10: v1(2892.36,862.28) 2892.36,1250.22 cw(c2906.44,1250.22) 2906.44,1264.29 U1.8@2982.03,1264.29
  Bottom Layer w10: C4.1@2846.17,629.42 2806.43,629.42 cw(c2806.43,642.31) 2793.54,642.31 2793.54,807.55 cw(c2808.68,807.55) 2808.68,822.69 2876.17,822.69 ccw(c2876.17,838.88) 2892.36,838.88 v1(2892.36,862.28)
  Bottom Layer w20: R6.2@2846.16,547.77 C4.1@2846.16,628.91
IAP1: C2.2 R2.2 U1.7 | length 977.6
  Top Layer w10: v1(2866.04,885.28) 2866.04,1268.69 cw(c2881.33,1268.69) 2881.33,1283.97 U1.7@2982.03,1283.97
  Bottom Layer w10: C2.2@2714.58,629.42 2729.58,629.42 2754.33,629.42 ccw(c2754.33,642.31) 2767.22,642.31 2767.22,830.55 cw(c2782.36,830.55) 2782.36,845.69 2849.85,845.69 ccw(c2849.85,861.88) 2866.04,861.88 v1(2866.04,885.28)
  Bottom Layer w20: R2.2@2729.58,548.28 C2.2@2729.58,629.42
IB_N1: D4.1 D4.2 J2.9 R12.1 R13.1 | length 864.2
  Top Layer w15: J2.9@2956.1,14.82 2956.1,93.56 cw(c2982.48,93.56) 2982.48,119.94 3172.73,119.94 ccw(c3172.73,151.69) 3204.48,151.69 3204.48,280.38 cw(c3221.74,280.38) 3221.74,297.64 D4.2@3250.17,297.64 D4.1@3324.97,297.64
  Top Layer w20: R12.1@3287.58,394.67 3303.48,394.67 3324.97,373.17 D4.1@3324.97,297.64
  Top Layer w30: R12.1@3287.58,394.67 3331.57,411.17 v1(3331.57,451.05)
  Bottom Layer w30: v1(3331.57,451.05) R13.1@3331.57,487.25
IB_P1: D3.1 D3.2 J2.8 R9.1 R11.2 | length 1028.2
  Top Layer w15: J2.8@2756.1,14.82 2836.8,14.82 ccw(c2836.8,34.13) 2856.1,34.13 2856.1,121.05 cw(c2885.05,121.05) 2885.05,150 3145.21,150 ccw(c3145.21,177.86) 3173.08,177.86 3173.08,278.78 ccw(c3154.16,278.73) 3154.16,297.65 3133.62,297.65 D3.1@3124.98,297.65 D3.2@3050.17,297.65
  Top Layer w20: D3.2@3050.17,297.65 3050.17,373.18 3071.67,394.67 R11.2@3087.58,394.67
  Top Layer w30: v1(3043.16,452.07) 3043.16,411.17 R11.2@3087.58,394.67
  Bottom Layer w30: v1(3043.16,452.07) R9.1@3043.16,488.27
IBN1: C8.1 R14.2 U1.10 | length 991.2
  Top Layer w10: v1(2950,885.28) 2950,1212.12 cw(c2962.8,1212.12) 2962.8,1224.92 U1.10@2982.03,1224.92
  Bottom Layer w10: v1(2950,885.28) 3179.6,885.28 cw(c3179.6,864.35) 3200.54,864.35 3200.54,642.94 ccw(c3213.43,642.94) 3213.43,630.05 C8.1@3253.17,630.05
  Bottom Layer w20: R14.2@3253.17,548.28 C8.1@3253.17,629.42
IBP1: C6.2 R10.2 U1.9 | length 1039.9
  Top Layer w10: v1(2923.68,862.28) 2923.68,1230.88 cw(c2937.4,1230.88) 2937.4,1244.6 U1.9@2982.03,1244.6
  Bottom Layer w10: v1(2923.68,862.28) 3160.44,862.28 cw(c3160.44,848.5) 3174.22,848.5 3174.22,642.94 cw(c3161.33,642.94) 3161.33,630.05 C6.2@3121.58,630.05
  Bottom Layer w20: R10.2@3121.58,548.28 C6.2@3121.58,629.42
IC_N1: D6.1 D6.2 J2.11 R18.1 R19.1 | length 865.4
  Top Layer w15: J2.11@3356.1,14.82 3356.1,93.56 cw(c3382.48,93.56) 3382.48,119.94 3575.75,119.94 ccw(c3575.75,148.67) 3604.48,148.67 3604.48,280.38 cw(c3621.74,280.38) 3621.74,297.64 D6.1@3724.97,297.65
  Top Layer w20: R18.1@3687.58,394.67 3703.48,394.67 3724.97,373.18 D6.1@3724.97,297.65
  Top Layer w30: R18.1@3687.58,394.67 3732.58,411.17 v1(3732.58,450)
  Bottom Layer w30: v1(3732.58,450) R19.1@3732.58,486.2
IC_P1: D5.1 D5.2 J2.10 R15.1 R17.2 | length 1027.7
  Top Layer w15: J2.10@3156.1,14.82 3236.8,14.82 ccw(c3236.8,34.13) 3256.1,34.13 3256.1,122.08 cw(c3284.02,122.08) 3284.02,150 3545.21,150 ccw(c3545.21,177.86) 3573.08,177.86 3573.08,278.78 ccw(c3554.16,278.73) 3554.16,297.65 3533.62,297.65 D5.1@3524.98,297.65 D5.2@3450.18,297.65
  Top Layer w20: D5.2@3450.18,297.65 3450.18,373.18 3471.67,394.67 R17.2@3487.58,394.67
  Top Layer w30: v1(3444.17,452.07) 3444.17,411.17 R17.2@3487.58,394.67
  Bottom Layer w30: v1(3444.17,452.07) R15.1@3444.17,488.28
ICN1: C14.1 R20.2 U1.12 | length 1261.6
  Top Layer w10: v1(3027.6,939.63) U1.12@3027.6,1199.03
  Bottom Layer w10: v1(3027.6,939.63) 3573,939.63 cw(c3573,911.09) 3601.54,911.09 ; 3601.54,913.09 3601.54,911.09 ; C14.1@3654.17,629.42 3614.43,629.42 cw(c3614.43,642.31) 3601.54,642.31 3601.54,911.09
  Bottom Layer w20: R20.2@3654.16,548.79 C14.1@3654.17,629.42 C14.1@3654.16,629.93
ICP1: C12.2 R16.2 U1.11 | length 1314.2
  Top Layer w10: v1(2976.32,913.63) 2976.32,1185.6 cw(c2989.76,1185.6) 2989.76,1199.03 U1.11@3007.92,1199.03
  Bottom Layer w10: v1(2976.32,913.63) 3551,913.63 cw(c3551,889.41) 3575.22,889.41 ; C12.2@3522.58,629.42 3562.33,629.42 ccw(c3562.33,642.31) 3575.22,642.31 3575.22,889.41 ; 3575.22,891.41 3575.22,889.41
  Bottom Layer w20: R16.2@3522.58,548.28 C12.2@3522.58,629.42
IDF: C102.1 R150.1 U17.5 | length 461.4
  Top Layer w15: v1(1945.07,3299) U17.5@1945.07,3235.85 1945.07,3168.37 ccw(c1971.87,3168.37) 1971.87,3141.57 2100.7,3141.57 C102.1@2107.66,3134.61
  Bottom Layer w15: R150.1@1930.66,3152.86 1930.66,3264.21 cw(c1979.86,3264.21) v1(1945.07,3299)